# Altium PCB DB46.PcbDoc (part 6 of 6)
Units mm, origin at the board's own origin, x right, y up, seen from the top; angles counter-clockwise.
Board outline 82.2 x 113.2 mm, 8 copper layers (Top Layer, MidLayer1, MidLayer2, GND, MidLayer3, VCC, MidLayer4, Bottom Layer), stack 1.576 mm thick; 186 components, 477 nets, 1727 pads, 1538 vias.
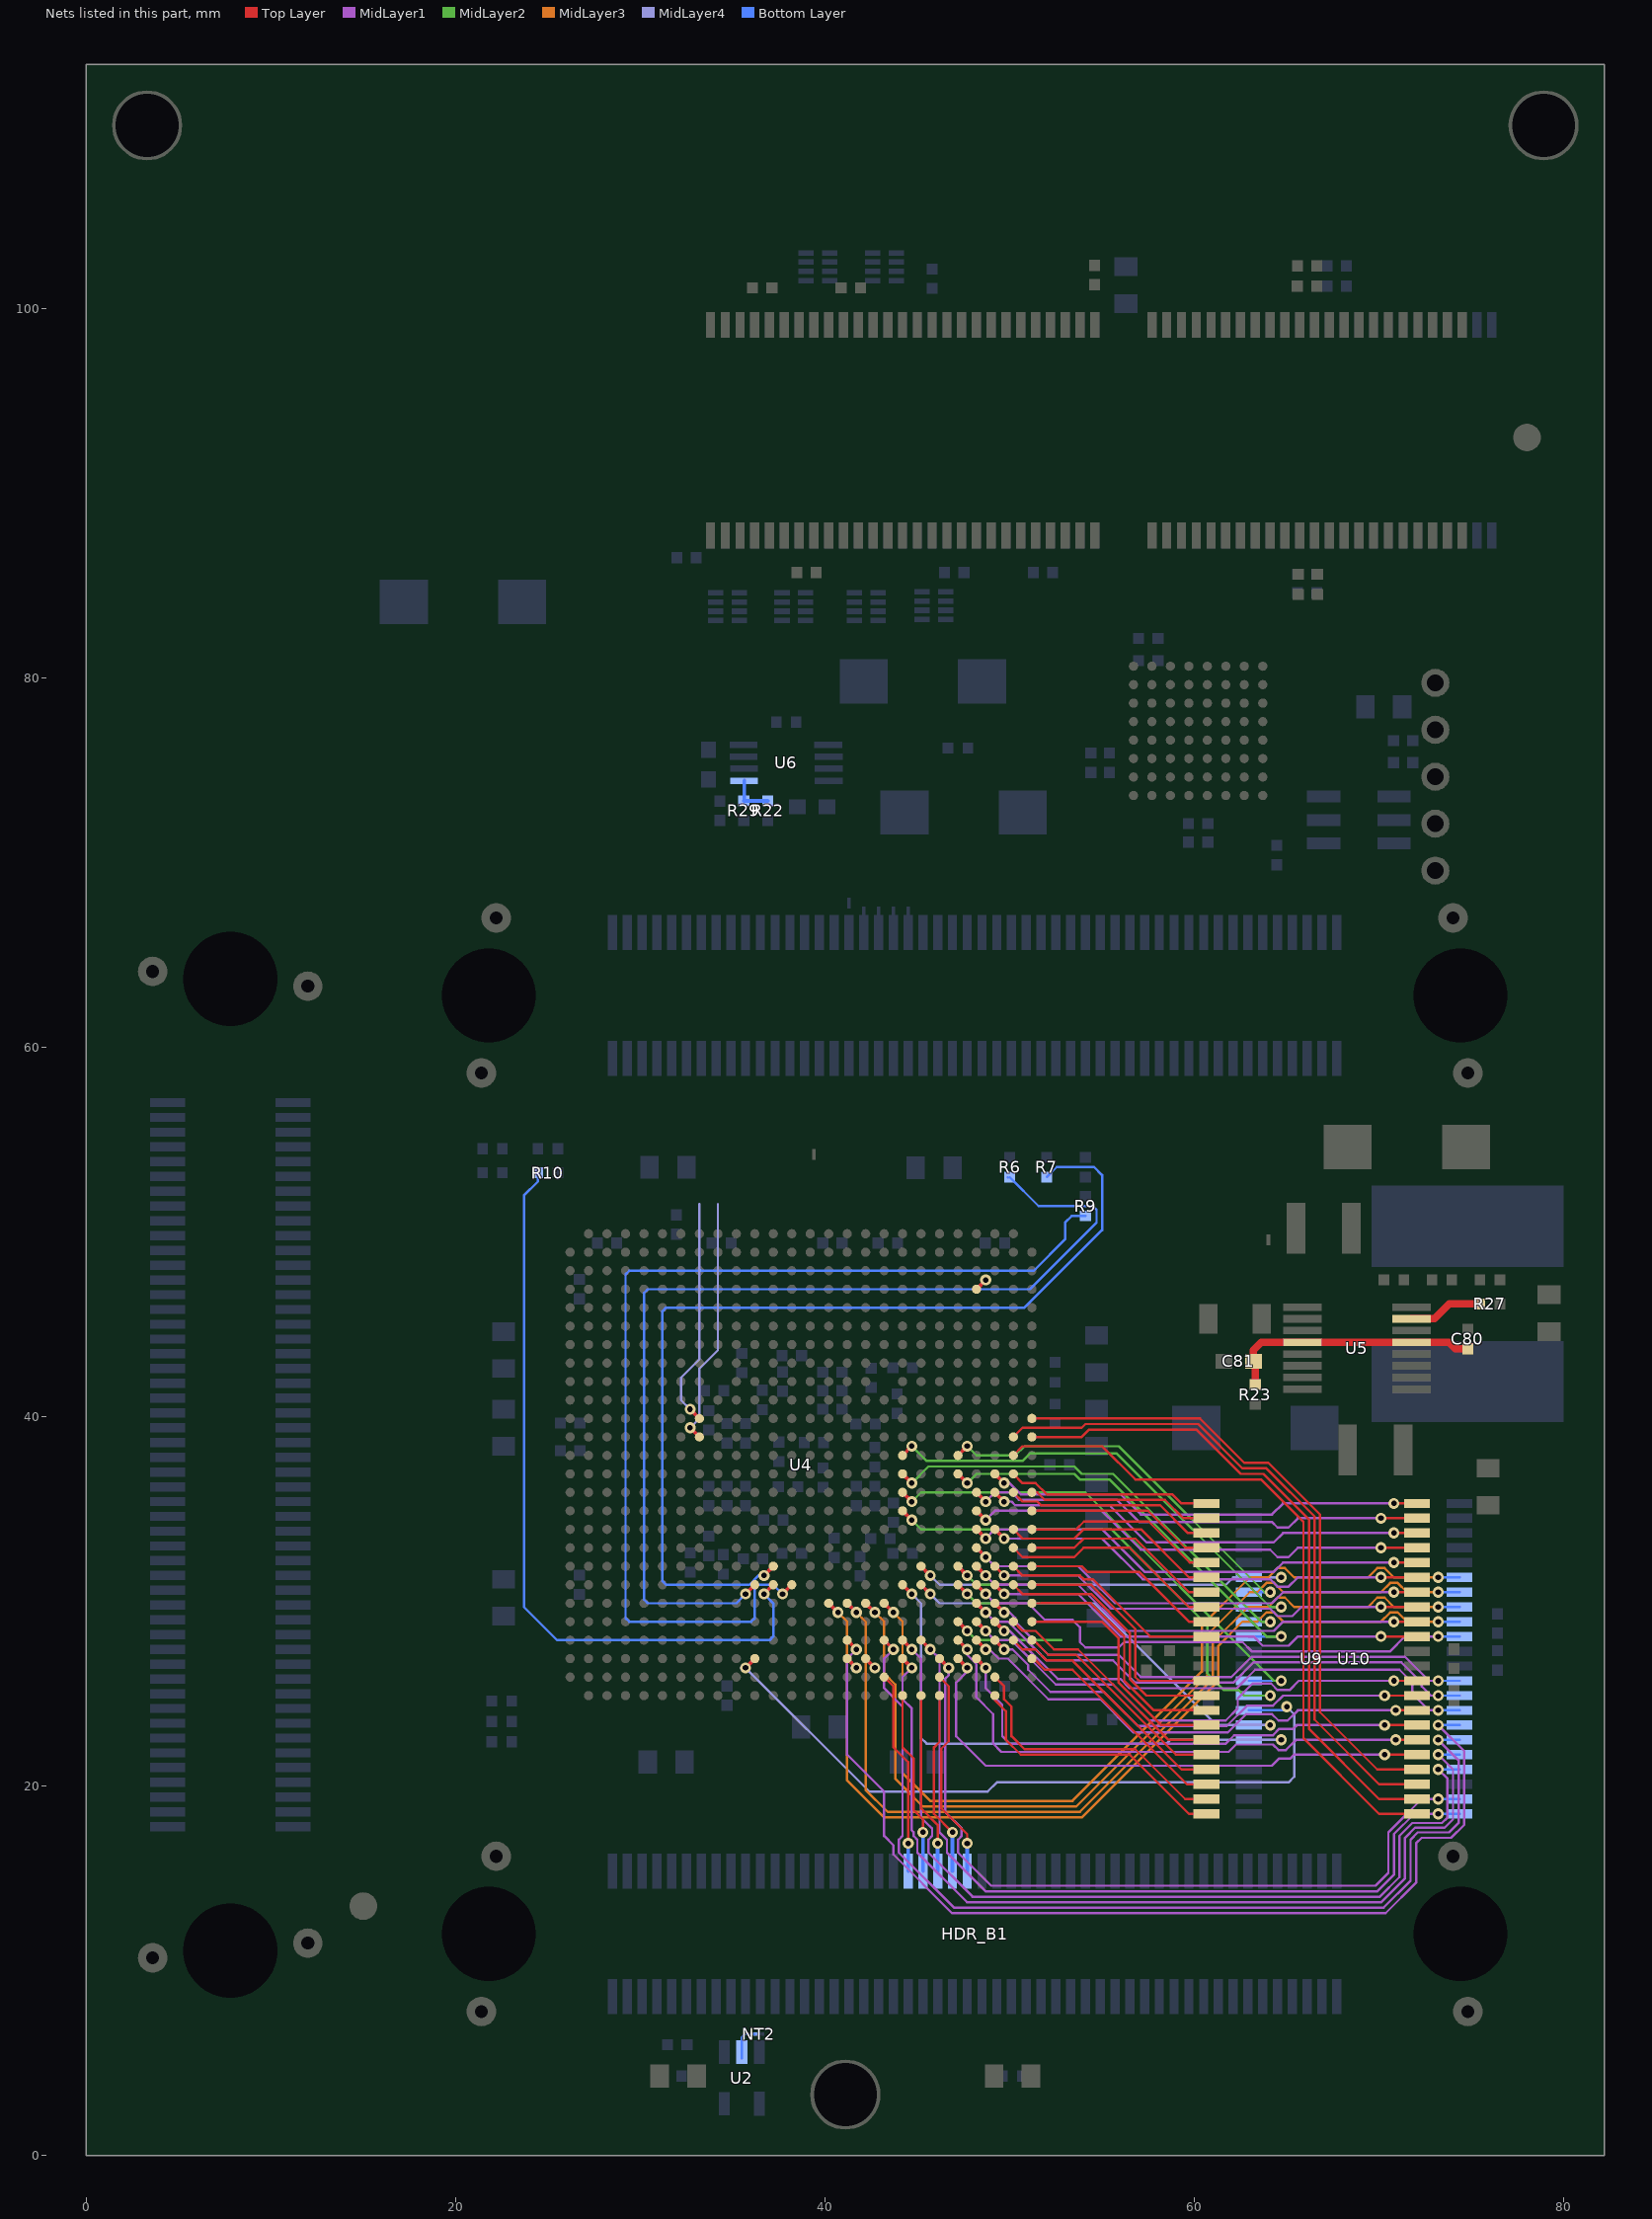
[diagram p12: the nets of this part, all layers, seen from the top]

## Via types
v1: diameter 0.6, hole 0.3, Top Layer to Bottom Layer, 904 vias
v2: diameter 0.6, hole 0.3, Top Layer to Bottom Layer, tented both sides, 506 vias
v3: diameter 0.7, hole 0.4, Top Layer to Bottom Layer, 127 vias
v4: diameter 0.6, hole 0.3, Top Layer to Bottom Layer, tented top, 1 vias

## Nets (pads, with @x,y where several pads share a name; then routed paths per layer and width w, separated by ;. In a path a pad name is that pad's centre, name@x,y a point inside that pad or via, vN(x,y) a via of type N, cw(c..) or ccw(c..) an arc to the next point about the centre after c; other vN are vias at no path point) (continued)
SRAM1_A16: U4.AD21 U10.43 | length 42.4
  Top Layer w0.2: U4.AD21@46.2,26.9 v1(46.7,26.4)
  MidLayer1 w0.127: v1(46.7,26.4) 46.7,26 46.5,25.8 46.5,23.3 46.5,23 46.5,18.6 47.4,17.7 47.4,17.3 47.2,17.1 47.2,16.4 48.994,14.606 69.806,14.606 70.5,15.3 70.5,17.5 72.3,19.3 v1(73.2,19.3)
  Bottom Layer w0.127: v1(73.2,19.3) U10.43@74.352,19.3
SRAM1_A17: U4.AC20 U10.44 | length 43.7
  Top Layer w0.2: U4.AC20@45.2,27.9 v1(45.7,27.4)
  MidLayer1 w0.127: v1(45.7,27.4) 46.2,26.9 46.2,23.3 46.2,23 46.2,17.5 46.6,17.1 46.6,16.4 48.694,14.306 69.906,14.306 70.8,15.2 70.8,17.4 71.9,18.5 v1(73.2,18.5)
  Bottom Layer w0.127: v1(73.2,18.5) U10.44@74.352,18.5
SRAM1_A18: U4.AA18 U10.28 | length 47.7
  Top Layer w0.2: U4.AA18@43.2,29.9 v1(43.7,29.4)
  MidLayer3 w0.127: v1(43.7,29.4) 44.2,28.9 44.2,23.3 44.2,23 44.2,20.7 45.7,19.2 53.4,19.2 60.4,26.2 60.4,28.7 63,31.3 64,31.3 64.5,31.8 64.9,31.8 65.4,31.3 69.4,31.3 69.9,31.8 70.3,31.8 70.8,31.3 v1(73.2,31.3)
  Bottom Layer w0.127: v1(73.2,31.3) U10.28@74.352,31.3
SRAM1_D0: U4.Y20 U10.7 | length 23.3
  Top Layer w0.2: U4.Y20@45.2,30.9 v1(45.7,30.4)
  MidLayer2 w0.127: v1@64.099,23.299 v1(64.105,23.299)
  MidLayer4 w0.127: v1(45.7,30.4) 46.2,29.9 52.8,29.9 53.1,29.9 54.6,29.9 61.2,23.299 v1(64.105,23.299)
  Bottom Layer w0.127: U10.7@62.952,23.3 v1(64.105,23.299) v1@64.205,23.299
SRAM1_D1: U4.AD11 U10.8 | length 39.7
  Top Layer w0.2: v1(35.7,26.4) U4.AD11@36.2,26.9
  MidLayer4 w0.127: v1(35.7,26.4) 42.4,19.7 48.8,19.7 49.3,20.2 65.1,20.2 65.4,20.5 65.4,23.9 v1(65,24.3)
  Bottom Layer w0.127: U10.8@62.952,24.1 64.8,24.1 v1(65,24.3)
  Bottom Layer w0.381: v1@35.592,26.4 v1(35.7,26.4)
SRAM1_D2: U4.T19 U10.9 | length 26.8
  Top Layer w0.2: U4.T19@44.2,34.9 v1(44.7,34.4)
  MidLayer2 w0.127: v1(44.7,34.4) 45.2,33.9 52.8,33.9 53.1,33.9 55.5,33.9 60.7,28.7 60.7,26.1 61.6,25.2 62.4,25.2 62.7,24.9 v1(64.105,24.9)
  Bottom Layer w0.127: U10.9@62.952,24.9 v1@64.205,24.9
SRAM1_D3: U4.R19 U10.10 | length 27
  Top Layer w0.2: U4.R19@44.2,35.9 v1(44.7,35.4)
  MidLayer2 w0.127: v1(44.7,35.4) 45.2,35.9 52.8,35.9 53.1,35.9 54.1,35.9 64.3,25.7 v1(64.7,25.7)
  Bottom Layer w0.127: U10.10@62.952,25.7 v1@64.8,25.7
SRAM1_D4: U4.P22 U10.13 | length 23.4
  Top Layer w0.2: U4.P22@47.2,36.9 v1(47.7,36.4)
  MidLayer2 w0.127: v1(47.7,36.4) 48.2,36.9 52.8,36.9 53.1,36.9 53.5,36.9 53.8,36.6 55.4,36.6 63.9,28.1 v1(64.7,28.1)
  Bottom Layer w0.127: U10.13@62.952,28.1 v1@64.8,28.1
SRAM1_D5: U4.P19 U10.14 | length 25.2
  Top Layer w0.2: U4.P19@44.2,36.9 v1(44.7,36.4)
  MidLayer2 w0.127: v1(44.7,36.4) 45.6,37.3 52.8,37.3 53.1,37.3 53.5,37.3 53.9,36.9 55.6,36.9 63.6,28.9 v1(64.105,28.9)
  Bottom Layer w0.127: U10.14@62.952,28.9 v1@64.205,28.9
SRAM1_D6: U4.N19 U10.15 | length 26.5
  Top Layer w0.178: U4.N19@44.2,37.9 v1(44.7,38.4)
  MidLayer2 w0.127: v1(44.7,38.4) 45.5,37.6 50.7,37.6 51.1,38 52.8,38 53.1,38 55.8,38 64.1,29.7 v1(64.7,29.7)
  Bottom Layer w0.127: U10.15@62.952,29.7 v1@64.8,29.7
SRAM1_D7: U4.N22 U10.16 | length 22.1
  Top Layer w0.2: U4.N22@47.2,37.9 v1(47.7,38.4)
  MidLayer2 w0.127: v1(47.7,38.4) 48.2,37.9 50.3,37.9 50.8,38.4 52.8,38.4 53.1,38.4 55.9,38.4 63.8,30.5 v1(64.105,30.5)
  Bottom Layer w0.127: U10.16@62.952,30.5 v1@64.205,30.5
SRAM1_D8: U4.AA17 U10.29 | length 48.3
  Top Layer w0.2: U4.AA17@42.2,29.9 v1(42.7,29.4)
  MidLayer3 w0.127: v1(42.7,29.4) 43.2,28.9 43.2,26.1 43.8,25.5 43.8,23.3 43.8,23 43.8,20.4 45.3,18.9 53.6,18.9 60.7,26 60.7,28.2 63,30.5 63.405,30.5 63.905,31 64.305,31 64.805,30.5 70.1,30.5 70.6,31 71,31 71.5,30.5 v1(73.2,30.5)
  Bottom Layer w0.127: v1(73.2,30.5) U10.29@74.352,30.5
SRAM1_D9: U4.AA16 U10.30 | length 49.8
  Top Layer w0.2: U4.AA16@41.2,29.9 v1(41.7,29.4)
  MidLayer3 w0.127: v1(41.7,29.4) 42.2,28.9 42.2,23.3 42.2,23 42.2,19.8 43.4,18.6 53.8,18.6 61,25.8 61,27.8 62.9,29.7 64,29.7 64.5,30.2 64.9,30.2 65.4,29.7 69.4,29.7 69.9,30.2 70.3,30.2 70.8,29.7 v1(73.2,29.7)
  Bottom Layer w0.127: v1(73.2,29.7) U10.30@74.352,29.7
SRAM1_D10: U4.AA15 U10.31 | length 50.3
  Top Layer w0.2: U4.AA15@40.2,29.9 v1(40.7,29.4)
  MidLayer3 w0.127: v1(40.7,29.4) 41.2,28.9 41.2,23.3 41.2,23 41.2,20.3 43.2,18.3 53.9,18.3 61.3,25.7 61.3,27.6 62.6,28.9 63.405,28.9 63.905,29.4 64.305,29.4 64.805,28.9 70.1,28.9 70.6,29.4 71,29.4 71.5,28.9 v1(73.2,28.9)
  Bottom Layer w0.127: v1(73.2,28.9) U10.31@74.352,28.9
SRAM1_D11: U4.Y23 U10.32 | length 28.7
  Top Layer w0.2: U4.Y23@48.2,30.9 v1(48.7,30.4)
  MidLayer1 w0.127: v1(48.7,30.4) 49.2,29.9 51,29.9 51.9,29 52.8,29 53.1,29 53.4,29 53.8,28.6 53.8,27.8 54.1,27.5 55.9,27.5 56.2,27.8 62.6,27.8 63.1,27.3 70.6,27.3 71.4,28.1 v1(73.2,28.1)
  Bottom Layer w0.127: v1(73.2,28.1) U10.32@74.352,28.1
SRAM1_D12: U4.AA24 U10.35 | length 27.9
  Top Layer w0.2: U4.AA24@49.2,29.9 v1(49.7,29.4)
  MidLayer1 w0.127: v1(49.7,29.4) 50,29.4 50.3,29.1 50.3,28.9 52.1,27.1 52.8,27.1 53.1,27.1 55.9,27.1 57.1,25.9 62,25.9 63.1,27 71.4,27 72.7,25.7 v1(73.2,25.7)
  Bottom Layer w0.127: v1(73.2,25.7) U10.35@74.352,25.7
SRAM1_D13: U4.AA23 U10.36 | length 29.3
  Top Layer w0.2: U4.AA23@48.2,29.9 v1(48.7,29.4)
  MidLayer1 w0.127: v1(48.7,29.4) 49.2,28.9 49.9,28.9 52,26.8 52.8,26.8 53.1,26.8 55.6,26.8 56.8,25.6 62.1,25.6 63.2,26.7 71.2,26.7 72.3,25.6 72.3,25.4 72.8,24.9 v1(73.2,24.9)
  Bottom Layer w0.127: v1(73.2,24.9) U10.36@74.352,24.9
SRAM1_D14: U4.AB24 U10.37 | length 28.3
  Top Layer w0.2: U4.AB24@49.2,28.9 v1(49.7,28.4)
  MidLayer1 w0.127: v1(49.7,28.4) 50,28.4 52.6,25.8 52.8,25.8 53.1,25.8 56,25.8 56.5,25.3 62.3,25.3 63.3,26.3 71.1,26.3 71.8,25.6 71.8,25 72.7,24.1 v1(73.2,24.1)
  Bottom Layer w0.127: v1(73.2,24.1) U10.37@74.352,24.1
SRAM1_D15: U4.AC16 U10.38 | length 55.6
  Top Layer w0.2: U4.AC16@41.2,27.9 v1(41.7,27.4)
  MidLayer1 w0.127: v1(41.7,27.4) 41.2,26.9 41.2,23.3 41.2,23 41.2,21.7 43.2,19.7 43.2,17.3 43.7,16.8 43.7,16.3 46.875,13.125 70.35,13.125 72,14.775 72,15.3 72,16.9 72.3,17.2 73.9,17.2 74.6,17.9 74.6,21.9 v1(73.2,23.3)
  Bottom Layer w0.127: v1(73.2,23.3) U10.38@74.352,23.3
SRAM1_NBHE: U4.AD19 U10.40 | length 49.5
  Top Layer w0.2: U4.AD19@44.2,26.9 v1(44.7,26.4)
  MidLayer1 w0.127: v1(44.7,26.4) 44.2,25.9 44.2,24.7 44.7,24.2 44.7,23.3 44.7,23 44.7,17.6 44.8,17.5 44.8,17.3 45,17.1 45,16.4 47.681,13.719 70.119,13.719 71.4,15 71.4,15.6 ; 71.4,15.6 71.4,17.2 71.946,17.746 73.546,17.746 74,18.2 74,20.9 v1(73.2,21.7)
  Bottom Layer w0.127: v1(73.2,21.7) U10.40@74.352,21.7
SRAM1_NBLE: U4.AC18 U10.39 | length 53.2
  Top Layer w0.2: U4.AC18@43.2,27.9 v1(43.7,27.4)
  MidLayer1 w0.127: v1(43.7,27.4) 43.2,26.9 43.2,25.3 44.2,24.3 44.2,23.3 44.2,23 44.2,17.3 44,17.1 44,16.4 46.975,13.425 70.25,13.425 71.7,14.875 71.7,15.4 71.7,17.1 72.092,17.492 73.792,17.492 74.3,18 74.3,21.4 v1(73.2,22.5)
  Bottom Layer w0.127: v1(73.2,22.5) U10.39@74.352,22.5
SRAM1_NCS: U4.Y19 U10.6 | length 30.3
  Top Layer w0.2: U4.Y19@44.2,30.9 v1(44.7,30.4)
  MidLayer4 w0.127: v1(44.7,30.4) 45.2,29.9 45.2,23.3 45.2,23 45.2,22.6 45.5,22.3 58.5,22.3 58.7,22.5 v1(64.7,22.5)
  Bottom Layer w0.127: U10.6@62.952,22.5 v1(64.7,22.5) v1@64.8,22.5
SRAM1_NOE: U4.AC19 U10.41 | length 51.3
  Top Layer w0.2: U4.AC19@44.2,27.9 v1(44.7,27.4)
  MidLayer1 w0.127: v1(44.7,27.4) 45.2,26.9 ; 45.2,24 45.2,26.9 ; v1(73.2,20.9) 73.7,20.4 73.7,18.3 73.4,18 71.8,18 71.1,17.3 71.1,15.7 71.1,15.075 70.037,14.012 47.987,14.012 45.6,16.4 45.6,17.1 45.8,17.3 45.8,17.7 45.7,17.8 45.2,18.3 45.2,23 45.2,23.3 45.2,26.9
  Bottom Layer w0.127: v1(73.2,20.9) U10.41@74.352,20.9
SRAM1_NWE: U4.W20 U10.17 | length 21.9
  Top Layer w0.2: U4.W20@45.2,31.9 v1(45.7,31.4)
  MidLayer4 w0.127: v1(45.7,31.4) 46.2,30.9 50.9,30.9 52.8,30.9 53.1,30.9 61.7,30.9 62.1,31.3 v1(64.7,31.3)
  Bottom Layer w0.127: U10.17@62.952,31.3 v1(64.7,31.3) v1@64.8,31.3
SRAM2_A0: U4.N25 U9.1 | length 37.2
  Top Layer w0.127: U4.N25@50.2,37.9 50.7,38.4 52.8,38.4 53.1,38.4 55,38.4 56.8,36.6 63.6,36.6 65.9,34.3 65.9,22.6 70,18.5 U9.1@72.052,18.5
SRAM2_A1: U4.M26 U9.2 | length 35.9
  Top Layer w0.127: U4.M26@51.2,38.9 52.8,38.9 53.1,38.9 53.9,38.9 54.3,39.3 60.1,39.3 62.5,36.9 63.737,36.9 66.2,34.437 66.2,23.1 70,19.3 U9.2@72.052,19.3
SRAM2_A2: U4.M25 U9.3 | length 36.7
  Top Layer w0.127: U4.M25@50.2,38.9 50.7,39.4 52.8,39.4 53.1,39.4 53.9,39.4 54.1,39.6 60.2,39.6 62.6,37.2 63.9,37.2 66.5,34.6 66.5,23.6 70,20.1 U9.3@72.052,20.1
SRAM2_A3: U4.L26 U9.4 | length 35
  Top Layer w0.127: U4.L26@51.2,39.9 52.8,39.9 53.1,39.9 60.3,39.9 62.7,37.5 64,37.5 66.8,34.7 66.8,24 69.9,20.9 U9.4@72.052,20.9
SRAM2_A4: U4.AD22 U9.5 | length 30.5
  Top Layer w0.127: v1(70.299,21.7) U9.5@72.052,21.7
  Top Layer w0.2: U4.AD22@47.2,26.9 v1(47.7,26.4)
  MidLayer1 w0.127: v1(47.7,26.4) 47.7,26.2 47.1,25.6 47.1,23.3 47.1,23 47.1,22.7 48.7,21.1 64.2,21.1 64.6,21.5 65.2,21.5 65.4,21.7 v1(70.299,21.7)
SRAM2_A5: U4.U23 U9.18 | length 25.4
  Top Layer w0.127: v1@70.8,32.1 U9.18@72.052,32.1
  Top Layer w0.2: U4.U23@48.2,33.9 v1(48.7,33.4)
  MidLayer1 w0.127: v1(48.7,33.4) 49.2,33.9 52.1,33.9 52.8,33.9 53.1,33.9 55,33.9 57.3,31.6 64.3,31.6 64.8,32.1 v1(70.8,32.1)
SRAM2_A6: U4.T23 U9.19 | length 25.5
  Top Layer w0.127: v1(70.1,32.9) U9.19@72.052,32.9
  Top Layer w0.2: U4.T23@48.2,34.9 v1(48.7,34.4)
  MidLayer1 w0.127: v1(48.7,34.4) 49.2,34.9 52.8,34.9 53.1,34.9 55,34.9 57.1,32.8 64.1,32.8 64.5,32.4 65.1,32.4 65.6,32.9 v1(70.1,32.9)
SRAM2_A7: U4.R24 U9.20 | length 24.2
  Top Layer w0.127: v1(70.8,33.7) U9.20@72.052,33.7
  Top Layer w0.2: U4.R24@49.2,35.9 v1(49.7,35.4)
  MidLayer1 w0.127: v1(49.7,35.4) 50.1,35.4 50.3,35.2 52.8,35.2 53.1,35.2 55.4,35.2 57.4,33.2 64.3,33.2 64.8,33.7 v1(70.8,33.7)
SRAM2_A8: U4.R23 U9.21 | length 25.3
  Top Layer w0.127: v1(70.1,34.5) U9.21@72.052,34.5
  Top Layer w0.2: U4.R23@48.2,35.9 v1(48.7,35.4)
  MidLayer1 w0.127: v1(48.7,35.4) 49.2,35.9 50.1,35.9 50.5,35.5 52.8,35.5 53.1,35.5 55.8,35.5 57,34.3 64.2,34.3 64.5,34 65.1,34 65.6,34.5 v1(70.1,34.5)
SRAM2_A9: U4.P24 U9.22 | length 24
  Top Layer w0.127: v1(70.8,35.3) U9.22@72.052,35.3
  Top Layer w0.2: U4.P24@49.2,36.9 v1(49.7,36.4)
  MidLayer1 w0.127: v1(49.7,36.4) 50,36.4 50.6,35.8 52.8,35.8 53.1,35.8 56,35.8 57.1,34.7 64.2,34.7 64.8,35.3 v1(70.8,35.3)
SRAM2_A10: U4.P25 U9.23 | length 11.1
  Top Layer w0.127: U4.P25@50.2,36.9 50.7,36.4 51.4,36.4 52,35.8 52.8,35.8 53.1,35.8 58.8,35.8 59.3,35.3 U9.23@60.6,35.3
SRAM2_A11: U4.R26 U9.24 | length 10
  Top Layer w0.127: U4.R26@51.2,35.9 51.5,35.9 51.9,35.5 52.8,35.5 53.1,35.5 58.4,35.5 59.4,34.5 U9.24@60.652,34.5
SRAM2_A12: U4.R25 U9.25 | length 11.4
  Top Layer w0.127: U4.R25@50.2,35.9 50.7,35.4 51.5,35.4 51.7,35.2 52.8,35.2 53.1,35.2 58.15,35.2 59.65,33.7 U9.25@60.652,33.7
SRAM2_A13: U4.T26 U9.26 | length 10.3
  Top Layer w0.127: U4.T26@51.2,34.9 52.8,34.9 53.1,34.9 57.5,34.9 59.5,32.9 U9.26@60.652,32.9
SRAM2_A14: U4.U26 U9.27 | length 10.6
  Top Layer w0.127: U4.U26@51.2,33.9 52.8,33.9 53.1,33.9 53.6,33.9 54.025,34.325 57.525,34.325 59.75,32.1 U9.27@60.652,32.1
SRAM2_A15: U4.AD26 U9.42 | length 12.3
  Top Layer w0.127: U4.AD26@51.2,26.9 51.3,26.9 51.9,26.3 52.8,26.3 53.1,26.3 53.4,26.3 59.6,20.1 U9.42@60.652,20.1
SRAM2_A16: U4.AE24 U9.43 | length 15.6
  Top Layer w0.127: U4.AE24@49.2,25.9 49.7,25.4 49.7,24.7 50.1,24.3 50.1,23.3 50.1,23 50.1,22.7 50.8,22 56.8,22 59.5,19.3 U9.43@60.7,19.3
SRAM2_A17: U4.AF24 U9.44 | length 15.2
  Top Layer w0.127: U4.AF24@49.2,24.9 49.2,24.65 49.8,24.05 49.8,23.3 49.8,23 49.8,22.5 50.6,21.7 56.5,21.7 59.7,18.5 U9.44@60.7,18.5
SRAM2_A18: U4.U25 U9.28 | length 11.9
  Top Layer w0.127: U4.U25@50.2,33.9 50.7,33.4 52.8,33.4 53.1,33.4 53.5,33.4 54,33.9 57.1,33.9 59.7,31.3 U9.28@60.652,31.3
SRAM2_D0: U4.AD23 U9.7 | length 27.8
  Top Layer w0.127: v1(70.299,23.3) U9.7@72.052,23.3
  Top Layer w0.2: U4.AD23@48.2,26.9 v1(48.7,26.4)
  MidLayer1 w0.127: v1(48.7,26.4) 48.7,25.3 49.6,24.4 49.6,23.3 49.6,23 49.6,22.7 50,22.3 61.7,22.3 62.15,22.75 64.25,22.75 64.6,23.1 65.35,23.1 65.55,23.3 v1(70.299,23.3)
SRAM2_D1: U4.AC23 U9.8 | length 26.7
  Top Layer w0.127: v1(70.9,24.1) U9.8@72.052,24.1
  Top Layer w0.2: U4.AC23@48.2,27.9 v1(48.7,27.4)
  MidLayer1 w0.127: v1(48.7,27.4) 48.9,27.4 49.4,26.9 49.9,26.9 52.1,24.7 52.8,24.7 53.1,24.7 54.9,24.7 56.7,22.9 61.8,22.9 62.8,23.9 64.2,23.9 64.55,23.55 65.05,23.55 65.6,24.1 v1(70.9,24.1)
SRAM2_D2: U4.AC24 U9.9 | length 25.6
  Top Layer w0.127: v1(70.299,24.9) U9.9@72.052,24.9
  Top Layer w0.2: U4.AC24@49.2,27.9 v1(49.7,27.4)
  MidLayer1 w0.127: v1(49.7,27.4) 50.15,27.4 51,26.55 51,26.3 52.2,25.1 52.8,25.1 53.1,25.1 55.1,25.1 56.95,23.25 61.75,23.25 62.85,24.35 64.25,24.35 64.8,24.9 v1(70.299,24.9)
SRAM2_D3: U4.AB23 U9.10 | length 27.6
  Top Layer w0.127: v1(70.8,25.7) U9.10@72.052,25.7
  Top Layer w0.2: U4.AB23@48.2,28.9 v1(48.7,28.4)
  MidLayer1 w0.127: v1(48.7,28.4) 49.2,27.9 50.1,27.9 52.5,25.5 52.8,25.5 53.1,25.5 55.6,25.5 57.55,23.55 61.691,23.55 62.35,24.209 62.35,24.75 63.15,25.55 64.15,25.55 64.5,25.2 65.15,25.2 65.65,25.7 v1(70.8,25.7)
SRAM2_D4: U4.Y24 U9.13 | length 24.4
  Top Layer w0.127: v1(70.1,28.1) U9.13@72.052,28.1
  Top Layer w0.2: U4.Y24@49.2,30.9 v1(49.7,30.4)
  MidLayer1 w0.127: v1(49.7,30.4) 52.8,30.4 53.1,30.4 53.7,30.4 56,28.1 63.2,28.1 63.7,27.6 65.1,27.6 65.6,28.1 v1(70.1,28.1)
SRAM2_D5: U4.W23 U9.14 | length 25.5
  Top Layer w0.127: v1(70.8,28.9) U9.14@72.052,28.9
  Top Layer w0.2: U4.W23@48.2,31.9 v1(48.7,31.4)
  MidLayer1 w0.127: v1(48.7,31.4) 49.2,30.9 52.8,30.9 53.1,30.9 53.7,30.9 56.2,28.4 64.3,28.4 64.8,28.9 v1(70.8,28.9)
SRAM2_D6: U4.W24 U9.15 | length 24.2
  Top Layer w0.127: U4.W24@49.2,31.9 v1(49.7,31.4) ; v1(70.1,29.7) U9.15@72.052,29.7
  MidLayer1 w0.127: v1(49.7,31.4) 52.8,31.4 53.1,31.4 53.7,31.4 55.5,29.6 64.1,29.6 64.5,29.2 65.3,29.2 65.8,29.7 v1(70.1,29.7)
SRAM2_D7: U4.V23 U9.16 | length 25.3
  Top Layer w0.127: v1(70.8,30.5) U9.16@72.052,30.5
  Top Layer w0.2: U4.V23@48.2,32.9 v1(48.7,32.4)
  MidLayer1 w0.127: v1(48.7,32.4) 49.2,31.9 52.8,31.9 53.1,31.9 53.7,31.9 55.7,29.9 64.2,29.9 64.8,30.5 v1(70.8,30.5)
SRAM2_D8: U4.V26 U9.29 | length 10.9
  Top Layer w0.127: U4.V26@51.2,32.9 52.8,32.9 53.1,32.9 53.5,32.9 54,33.4 56.8,33.4 59.7,30.5 U9.29@60.652,30.5
SRAM2_D9: U4.V25 U9.30 | length 12.2
  Top Layer w0.127: U4.V25@50.2,32.9 50.7,32.4 52.8,32.4 53.1,32.4 53.5,32.4 54,32.9 56.5,32.9 59.7,29.7 U9.30@60.652,29.7
SRAM2_D10: U4.W26 U9.31 | length 10.7
  Top Layer w0.127: U4.W26@51.2,31.9 52.8,31.9 53.1,31.9 53.9,31.9 54.2,31.6 57,31.6 59.7,28.9 U9.31@60.652,28.9
SRAM2_D11: U4.W25 U9.32 | length 12
  Top Layer w0.127: U4.W25@50.2,31.9 50.7,31.4 52.8,31.4 53.1,31.4 53.8,31.4 54,31.2 54.5,31.2 57.6,28.1 U9.32@60.652,28.1
SRAM2_D12: U4.Y26 U9.35 | length 13.1
  Top Layer w0.127: U4.Y26@51.2,30.9 52.8,30.9 53.1,30.9 54.4,30.9 56.8,28.5 56.8,25.9 57,25.7 U9.35@60.652,25.7
SRAM2_D13: U4.Y25 U9.36 | length 14.4
  Top Layer w0.127: U4.Y25@50.2,30.9 50.7,30.4 52.3,30.4 ; 52.3,30.4 53.6,30.4 54.4,30.4 56.5,28.3 56.5,25.8 57.4,24.9 U9.36@60.652,24.9
SRAM2_D14: U4.AA26 U9.37 | length 13.3
  Top Layer w0.127: U4.AA26@51.2,29.9 51.7,29.9 53.2,29.9 53.5,29.9 54.399,29.9 56.2,28.099 56.2,25.7 57.8,24.1 U9.37@60.652,24.1
SRAM2_D15: U4.AB26 U9.38 | length 13.2
  Top Layer w0.127: U4.AB26@51.2,28.9 52.5,28.9 52.8,28.9 55,28.9 55.9,28 55.9,25.6 58.2,23.3 U9.38@60.652,23.3
SRAM2_NBHE: U4.AC26 U9.40 | length 12
  Top Layer w0.127: U4.AC26@51.2,27.9 51.3,27.9 52.1,27.1 52.8,27.1 53.1,27.1 53.6,27.1 55.3,25.4 59,21.7 U9.40@60.652,21.7
SRAM2_NBLE: U4.AB25 U9.39 | length 13.1
  Top Layer w0.127: U4.AB25@50.2,28.9 50.7,28.4 51.4,28.4 52.4,27.4 52.8,27.4 53.1,27.4 53.7,27.4 55.6,25.5 58.6,22.5 U9.39@60.652,22.5
SRAM2_NCS: U4.AC22 U9.6 | length 30
  Top Layer w0.127: v1(70.9,22.5) U9.6@72.052,22.5
  Top Layer w0.2: U4.AC22@47.2,27.9 v1(47.7,27.4)
  MidLayer1 w0.127: v1(47.7,27.4) 47.7,27.1 48.2,26.6 48.2,24.8 49.1,23.9 49.1,23.3 49.1,23 49.1,22.3 49.55,21.85 61.85,21.85 62.25,22.25 64.25,22.25 64.55,21.95 64.95,21.95 65.5,22.5 v1(70.9,22.5)
SRAM2_NOE: U4.AC25 U9.41 | length 13.4
  Top Layer w0.127: U4.AC25@50.2,27.9 50.7,27.4 51.4,27.4 52,26.8 52.8,26.8 53.1,26.8 53.4,26.8 59.3,20.9 U9.41@60.652,20.9
SRAM2_NWE: U4.U24 U9.17 | length 24.3
  Top Layer w0.127: v1(70.1,31.3) U9.17@72.052,31.3
  Top Layer w0.2: U4.U24@49.2,33.9 v1(49.7,33.4)
  MidLayer1 w0.127: v1(49.7,33.4) 52.8,33.4 53.1,33.4 55,33.4 57.2,31.2 64.1,31.2 64.5,30.8 65.1,30.8 65.6,31.3 v1(70.1,31.3)
STATUS_LED: NT2.1 U2.2 | length 1.9
  Bottom Layer w0.127: U2.2@35.5,5.275 U2.2@35.5,5.6 35.5,6.4 35.675,6.575 NT2.1@36.2,6.575
SW0: HDR_B1.42 U4.AE18 | length 11
  Top Layer w0.127: U4.AE18@43.2,25.9 43.7,25.4 43.7,23.3 43.7,23 43.7,22.1 44.5,21.3 v2(44.5,16.9)
  Bottom Layer w0.2: HDR_B1.42@44.5,15.4 v2(44.5,16.9)
SW1: HDR_B1.44 U4.AF19 | length 10
  Top Layer w0.127: U4.AF19@44.2,24.9 44.2,23.3 44.2,23 44.2,22.1 44.8,21.5 44.8,18.7 45.3,18.2 v2(45.3,17.5)
  Bottom Layer w0.2: HDR_B1.44@45.3,15.4 v2(45.3,17.5)
SW2: HDR_B1.46 U4.AF20 | length 9.9
  Top Layer w0.127: U4.AF20@45.2,24.9 45.2,23.3 45.2,23 45.2,18.8 46.1,17.9 v2(46.1,16.9)
  Bottom Layer w0.2: HDR_B1.46@46.1,15.4 v2(46.1,16.9)
SW3: HDR_B1.48 U4.AF21 | length 10
  Top Layer w0.127: U4.AF21@46.2,24.9 46.2,23.3 46.2,23 46.2,22.4 45.9,22.1 45.9,18.5 v2@46.9,17.5
  Bottom Layer w0.2: HDR_B1.48@46.9,15.4 v2(46.9,17.5)
SW4: HDR_B1.50 U4.AE21 | length 11.5
  Top Layer w0.127: U4.AE21@46.2,25.9 46.7,25.4 46.7,23.3 46.7,23 46.7,22.425 46.3,22.025 46.3,18.8 47.7,17.4 v2(47.7,16.9)
  Bottom Layer w0.2: HDR_B1.50@47.7,15.4 v2(47.7,16.9)
TCK: R7.2 U4.W12 | length 53.1
  Top Layer w0.2: v1(36.7,31.4) U4.W12@37.2,31.9
  Bottom Layer w0.127: v1(36.7,31.4) 36.4,31.4 35.9,30.9 31.4,30.9 31.2,31.1 31.2,45.7 31.4,45.9 50.8,45.9 55,50.1 55,53.076 54.56,53.515 52.553,53.515 R7.2@52,52.962
TDI: R10.2 U4.Y12 | length 41.4
  Top Layer w0.2: v1(36.7,30.4) U4.Y12@37.2,30.9
  Bottom Layer w0.127: R10.2@24.462,53.2 24.462,52.738 23.7,51.976 23.7,29.7 25.5,27.9 37,27.9 37.2,28.1 37.2,29.9 v1(36.7,30.4)
TDO: R9.2 U4.Y13 | length 56.7
  Top Layer w0.2: v1(37.7,30.4) U4.Y13@38.2,30.9
  Bottom Layer w0.127: v1(37.7,30.4) 37.2,30.9 36.3,30.9 36.2,30.8 36.2,29.1 36,28.9 29.4,28.9 29.2,29.1 29.2,33.7 29.2,47.7 29.4,47.9 30.4,47.9 51.3,47.9 53,49.6 53,50.5 53.362,50.862 R9.2@54.1,50.862
TMS: R6.2 U4.Y11 | length 55.3
  Top Layer w0.2: v1(35.7,30.4) U4.Y11@36.2,30.9
  Bottom Layer w0.127: v1(35.7,30.4) 35.2,29.9 30.4,29.9 30.2,30.1 30.2,46.7 30.4,46.9 51.1,46.9 54.7,50.5 54.7,51.2 54.5,51.4 51.562,51.4 R6.2@50,52.962 ; R6.2@49.9,52.962 R6.2@49.905,52.939
TOFF: R27.1 U5.7 | length 4.1
  Top Layer w0.4: U5.7@71.744,45.294 71.75,45.3 73,45.3 73.8,46.1 R27.1@75.462,46.1
UNUSED1: U4.D23 | length 0.7
  Top Layer w0.2: U4.D23@48.2,46.9 v1(48.7,47.4)
UNUSED2: U4.AB22 | length 6
  Top Layer w0.2: U4.AB22@47.2,28.9 v1(47.7,28.4)
  MidLayer2 w0.127: v1(47.7,28.4) 48.2,27.9 52.8,27.9
UNUSED3: U4.Y22 | length 6
  Top Layer w0.2: U4.Y22@47.2,30.9 v1(47.7,30.4)
  MidLayer2 w0.127: v1(47.7,30.4) 48.2,29.9 52.8,29.9
UNUSED4: U4.M8 | length 13.4
  Top Layer w0.2: v1(32.7,39.4) U4.M8@33.2,38.9
  MidLayer4 w0.127: v1(32.7,39.4) 33.2,39.9 33.2,42.6 34.2,43.6 34.2,51.5
UNUSED5: U4.L8 | length 12.4
  Top Layer w0.2: v1(32.7,40.4) U4.L8@33.2,39.9
  MidLayer4 w0.127: v1(32.7,40.4) 32.2,40.9 32.2,42.1 33.2,43.1 33.2,51.5
UNUSED6: U4.W22 | length 6
  Top Layer w0.2: U4.W22@47.2,31.9 v1(47.7,31.4)
  MidLayer2 w0.127: v1(47.7,31.4) 48.2,30.9 52.8,30.9
VFILT: C80.1 C81.1 R23.2 U5.5 U5.12 | length 13.8
  Top Layer w0.4: R23.2@63.3,41.738 63.3,42.9 C81.1@63.2,43 63.2,43.6 63.624,44.024 U5.12@65.852,44.024 ; U5.12@65.852,44.024 U5.5@71.744,44.024 73.775,44.025 74.125,43.675 C80.1@74.8,43.675
VRN_7: U4.AD17 | length 0.7
  Top Layer w0.2: U4.AD17@42.2,26.9 v1(42.7,26.4)
VRP_7: U4.AD16 | length 0.8
  Top Layer w0.2: U4.AD16@41.2,26.9 v1(41.7,26.4)
  Bottom Layer w0.381: v1@41.592,26.4 v1(41.7,26.4)
VSET: R22.1 R29.1 U6.5 | length 2.4
  Bottom Layer w0.203: R29.1@35.6,73.338 R22.1@36.9,73.338 ; R29.1@35.625,73.363 U6.5@35.625,74.425
pads on no net: FD1.0 FD2.0 HDR_B1.93 HDR_B1.95 HDR_B1.MH5 HDR_B1.MH6 HDR_L1.MH5 HDR_L1.MH6 HDR_T1.95 HDR_T1.MH5 HDR_T1.MH6 MH1.MOUNT MH2.MOUNT MH3.MOUNT U1.5 U2.1 U3.A1 U3.A8 U3.B1 U3.B4 U3.C1 U3.D1 U3.E1 U3.F8 U3.G1 U3.G8 U3.H1 U3.H8 U4.A3 U4.A4 U4.A5 U4.A11 U4.AD7 U4.AD20 U4.AD25 U4.AE7 U4.AE20 U4.B3 U4.B4 U4.C5 U4.D5 U4.E7 U4.E9 U4.G5 U4.G6 U4.G11 U4.G13 U4.G21 U4.G22 U4.H7 U4.H8 U4.H12 U4.H13 U4.N24 U4.R5 U4.R6 U4.R21 U4.R22 U4.T21 U4.W13 U4.Y14 U7.40 U8.40
copper on no net: | length 13.1
  Top Layer w0.127: v1(31.7,25.4) 32.2,25.9 ; 45.2,25.9 v1(45.7,25.4)
  Top Layer w0.2: v1(29.7,35.4) 30.2,35.9 ; v1(29.7,44.4) 30.2,43.9 ; v1(30.7,35.4) 31.2,35.9 ; v1(30.7,44.4) 31.2,43.9 ; v1(31.7,26.4) 32.2,26.9 ; 38.2,43.9 38.2,43.925 ; 39.2,30.85 39.2,30.9 ; 45.2,26.9 v1(45.7,26.4) ; 46.2,34.9 v1(46.7,34.4) ; 46.2,35.9 v1(46.7,35.4) ; 46.2,43.9 v1(46.7,44.4) ; 47.2,35.9 v1(47.7,35.4) ; 47.2,43.9 v1(47.7,44.4) ; 49.2,37.9 v1(49.7,38.4)
  MidLayer1 w0.127: v1(49.7,38.4) 52.8,38.4
  Bottom Layer w0.2: v1@45.7,26.361 v1(45.7,26.4)
  other v1: 41.1,1.1 39.544,1.744 42.656,1.744 38.9,3.3 43.3,3.3 39.544,4.856 42.656,4.856 41.1,5.5 3.3,107.7 78.9,107.7 1.744,108.344 4.856,108.344 77.344,108.344 80.456,108.344 1.1,109.9 5.5,109.9 76.7,109.9 81.1,109.9 1.744,111.456 4.856,111.456 77.344,111.456 80.456,111.456 3.3,112.1 78.9,112.1

## Polygon pours and split planes (outlines as drawn)
AGND on Top Layer "Toplayer- AGND" (solid, remove dead copper, pour order 1000): 60.391,52.77 60.391,42.6 78.443,42.6 78.443,52.77
GND on Top Layer "GROUND-TOP-LAYER" (solid, remove dead copper, pour order 1009): 0.5,104.968 7.587,104.968 7.587,112 74.412,112 74.412,104.968 81.5,104.968 81.5,0.5 46.062,0.5 46.062,7.531 35.937,7.531 35.937,0.5 0.5,0.5
1V2 on MidLayer1 "MidLayer1-1V2" (solid, remove dead copper, pour order 1002): 32.2,45 48.6,45 48.2,44.6 48.2,29.9 32.5,29.9 32.2,29.9 32.2,36 18.4,36 18.4,39.4 32.2,39.4
1V2 on MidLayer1 "1V2 Power" (solid, remove dead copper, pour order 1003): 79.3,56.1 79.3,35.7 43.603,35.7 43.5,35.6 43.5,38.6 54.919,38.6 55.228,38.9 61.4,44.9 61.4,47.8 61.4,55.8 61.091,56.1 79.3,56.1
GND on MidLayer1 "GROUND-MID1-LAYER" (solid, remove dead copper, pour order 1005): 0.5,104.968 7.587,104.968 7.587,112 74.412,112 74.412,104.968 81.5,104.968 81.5,0.5 46.062,0.5 46.062,7.531 35.937,7.531 35.937,0.5 0.5,0.5
GND on MidLayer2 "GROUND-MID2-LAYER" (solid, remove dead copper, pour order 1006): 0.5,104.968 7.587,104.968 7.587,112 74.412,112 74.412,104.968 81.5,104.968 81.5,0.5 46.062,0.5 46.062,7.531 35.937,7.531 35.937,0.5 0.5,0.5
GND on MidLayer3 "GROUND-MID3-LAYER" (solid, remove dead copper, pour order 1007): 0.5,104.968 7.587,104.968 7.587,112 74.412,112 74.412,104.968 81.5,104.968 81.5,0.5 46.062,0.5 46.062,7.531 35.937,7.531 35.937,0.5 0.5,0.5
2V5 on MidLayer4 "2V5 Plane" (solid, remove dead copper, pour order 1001): 48,22.8 48,50.1 38.735,58.166 38.735,71.374 42.418,71.374 42.418,78.105 47.498,78.105 47.498,81.534 34.925,81.534 26.6,73.8 21.7,68.9 21.7,54.1 26.7,54.1 31.4,49.5 31.4,22.8
GND on MidLayer4 "MidLayer4-GND" (solid, remove dead copper, pour order 1004): 0.4,112.7 0.5,112.8 81.6,112.8 81.6,0.5 0.5,0.5
GND on Bottom Layer "GROUND-BOTTOM-LAYER" (solid, remove dead copper, pour order 1008): 0.5,104.968 7.587,104.968 7.587,112 74.412,112 74.412,104.968 81.5,104.968 81.5,0.5 46.062,0.5 46.062,7.531 35.937,7.531 35.937,0.5 0.5,0.5
GND on GND (split plane): 81.689,112.689 81.689,0.51 0.51,0.51 0.51,112.689 38.7,112.689
3V3 on VCC (split plane): 38.7,112.689 68.627,112.689 68.627,103.155 68.635,103.09 68.66,103.029 68.7,102.977 69.113,102.565 69.135,102.547 69.165,102.525 69.226,102.499 69.291,102.491 77.264,102.491 78.894,100.86 78.894,58.905 77.841,57.852 74.204,57.852 71.178,60.878 71.126,60.918 71.065,60.943 71,60.952 66.8,60.952 66.735,60.943 66.674,60.918 66.622,60.878 66.472,60.728 66.432,60.676 66.406,60.615 66.398,60.55 66.398,56.054 61.722,51.378 61.682,51.326 61.656,51.265 61.648,51.2 61.648,40.4 61.656,40.335 61.682,40.274 61.722,40.222 62.122,39.822 62.174,39.782 62.235,39.756 62.3,39.748 65.6,39.748 65.665,39.756 65.726,39.782 65.778,39.822 66.504,40.548 68.889,40.548 69.217,40.22 69.217,36.576 69.225,36.511 69.251,36.45 69.291,36.398 69.418,36.271 69.47,36.231 69.531,36.205 69.596,36.197 76.346,36.197 77.348,35.195 77.348,32.7 77.348,31.6 77.348,20.204 74.895,17.752 72.1,17.752 72.035,17.743 71.974,17.718 71.922,17.678 70.622,16.378 70.582,16.326 70.556,16.265 70.548,16.2 70.548,13.304 66.472,9.228 66.432,9.176 66.406,9.115 66.398,9.05 66.398,0.51 0.51,0.51 0.51,112.689 38.7,112.689
5V0 on VCC (split plane): 81.689,112.689 81.689,0.51 66.902,0.51 66.902,8.945 70.978,13.022 71.018,13.074 71.043,13.135 71.052,13.2 71.052,16.095 72.204,17.248 75,17.248 75.065,17.256 75.126,17.282 75.178,17.322 77.778,19.922 77.801,19.951 77.818,19.974 77.826,19.992 77.843,20.035 77.852,20.1 77.852,31.6 77.852,32.7 77.852,35.3 77.843,35.365 77.818,35.426 77.796,35.456 77.778,35.478 76.629,36.627 76.577,36.667 76.516,36.692 76.451,36.701 69.721,36.701 69.721,40.325 69.712,40.39 69.687,40.451 69.647,40.503 69.172,40.978 69.12,41.018 69.059,41.043 68.994,41.052 66.4,41.052 66.335,41.043 66.274,41.018 66.222,40.978 65.495,40.252 62.404,40.252 62.152,40.504 62.152,51.095 66.828,55.772 66.868,55.824 66.893,55.885 66.902,55.95 66.902,60.445 66.904,60.448 70.895,60.448 73.922,57.422 73.944,57.404 73.974,57.382 74.035,57.356 74.1,57.348 77.945,57.348 78.011,57.356 78.071,57.382 78.124,57.422 79.325,58.623 79.365,58.675 79.39,58.736 79.398,58.801 79.398,100.965 79.39,101.03 79.365,101.091 79.342,101.121 79.325,101.143 77.547,102.921 77.494,102.961 77.434,102.986 77.368,102.995 69.396,102.995 69.131,103.26 69.131,112.689

## Keep-outs
Bottom Layer:
  rectangle: 33.297,106.543 38.297,108.943
  rectangle: 6.5,80 11.5,82.4
  rectangle: 67.15,84.7 72.15,86.8
Keep-Out Layer:
  circle w0.4: c74.392,62.8 r3
  circle w0.4: c21.792,62.8 r3
  circle w0.4: c7.792,63.7 r3
  circle w0.4: c7.792,11.1 r3
  circle w0.4: c21.792,12 r3
  circle w0.4: c74.392,12 r3
  region: 0,113.2 0,112.6 82.2,112.6 82.2,113.2
  rectangle: 0,0 82.2,0.6
  rectangle: 0,0 0.6,113.2
  region: 82.2,113.2 81.6,113.2 81.6,0 82.2,0

## Other copper
Top Layer:
  rectangle net AGND: 63.896,48.646 64.099,49.337
  rectangle net GND: 76.5,34.7 77,35.7
  rectangle net 5V0: 71.3,36.821 75.06,39.573
  rectangle net 5V0: 73.289,37.573 76.631,43.189
  region net LX: 70.325,43.6 67.2,43.6 67.2,41.207 70.325,41.207
  rectangle net 1V2: 72.4,53.34 76.9,55.753
  rectangle net GND: 78.575,45.049 79.822,45.349
  rectangle net GND: 67.2,64.8 69.6,68.4
  rectangle net 5V0: 67.2,57.2 69.6,60.8
  pour cut-out: 25.284,50.992 52.208,50.992 52.208,24.068 25.284,24.068
Bottom Layer:
  rectangle net 1V2: 67.085,48.304 70.8,51.913
  rectangle net 5V0: 67.2,6.4 69.6,8.8
  rectangle net LX: 67,41.1 71.1,43.9
  rectangle net 1V2: 72.4,50.1 76.9,55.7
  region net LX: 62.377,48.776 62.377,51.824 58.567,51.824 58.567,48.776
  rectangle net 3V3: 65.1,14.5 66.3,17.9
  rectangle net GND: 67.2,15.2 69.6,17.7
  rectangle net GND: 67.2,66 69.6,68.5
  rectangle net 5V0: 67.2,57.1 69.6,59.6
  rectangle net 5V0: 66.8,57.1 69.6,59.6
GND (plane layer: these items are gaps in the copper):
  text "GND" at 41.8,11.1 h1.52
VCC (plane layer: these items are gaps in the copper):
  lines w0.5: 66.65,0 66.65,9.05 70.8,13.2 70.8,16.2 72.1,17.5 75,17.5 77.6,20.1 77.6,31.6 77.6,32.7 77.6,35.3 76.451,36.449 69.596,36.449 69.469,36.576 69.469,40.325 68.994,40.8 66.4,40.8 65.6,40 62.3,40 61.9,40.4 61.9,51.2 66.65,55.95 66.65,60.55 66.8,60.7 71,60.7 74.1,57.6 77.945,57.6 79.146,58.801 79.146,100.965 77.368,102.743 69.291,102.743 68.879,103.155 68.879,113.2
  text "5V0" at 70.9,46.4 h1.52
  text "3V3" at 42.1,11.1 h1.52

## Silkscreen, mask and mechanical layers (free items; w line width, h text height)
Top Overlay:
  rectangle: 33.05,89 55.35,91.35
  rectangle: 56.85,88.975 75.359,91.325
  rectangle: 75.7,106.2 82.1,106.7
  rectangle: 72.8,106.2 75.7,113.2
  region: 47,112.975 43.025,112.975 43.025,106.2 47,106.2
  region: 75.4,112.75 75.4,113.2 43.025,113.2 43.025,112.75
  region: 75.8,106.2 75.8,107.025 43.025,107.025 43.025,106.2
  region: 42.925,106.2 42.925,113.2 42.425,113.2 42.425,106.2
  region: 40.6,106.2 40.6,113.2 40.475,113.2 40.475,106.2
  region: 41.1,106.2 41.1,113.2 40.9,113.2 40.9,106.2
  region: 41.675,106.2 41.675,113.2 41.375,113.2 41.375,106.2
  region: 42.275,106.2 42.275,113.2 41.9,113.2 41.9,106.2
  region: 40.125,106.2 40.125,113.2 40.05,113.2 40.05,106.2
  rectangle: 71.2,106.8 75.7,110.1
  region: 43.175,110.1 43.175,106.675 48.4,106.675 48.4,110.1
  rectangle: 33.966,3.3 34.325,5.3
  rectangle: 52.062,3.3 52.425,5.3
  region: 46.758,6.444 46.578,6.624 44.602,4.648 44.782,4.469
  rectangle: 44.602,4.648 44.856,5.537
  region: 45.019,4.232 45.198,4.052 47.174,6.028 46.994,6.208
  region: 46.087,4.052 46.087,4.306 45.198,4.306 45.198,4.052
  region: 78.733,105.057 78.479,105.057 78.479,102.263 78.733,102.263
  region: 77.85,104.428 78.03,104.248 78.658,104.877 78.479,105.057
  rectangle: 79.067,102.263 79.321,105.057
  region: 79.321,105.057 79.142,104.877 79.77,104.248 79.95,104.428
  region: 3.133,105.057 2.879,105.057 2.879,102.263 3.133,102.263
  region: 2.25,104.428 2.43,104.248 3.058,104.877 2.879,105.057
  rectangle: 3.467,102.263 3.721,105.057
  region: 3.721,105.057 3.542,104.877 4.17,104.248 4.35,104.428
  region: 70.8,17.659 70.8,36.175 68.45,36.175 68.45,17.659
  rectangle: 69.5,41.167 70.322,46.247
  rectangle: 25.369,14.776 41.346,15.691
  rectangle: 25.369,8.089 41.346,9.004
  rectangle: 68.981,8.089 70.835,15.684
  region: 27.274,15.691 25.369,15.691 25.369,8.089 27.274,8.089
  lines w0.076: 28.4,4.9 28.781,5.154 28.527,5.154 29.035,5.535 ; 28.781,5.281 29.035,5.535 ; 28.781,5.408 29.035,5.535 ; 54.293,4.75 54.674,5.004 54.42,5.004 54.928,5.385 ; 54.674,5.131 54.928,5.385 ; 54.674,5.258 54.928,5.385
  lines w0.127: 27.385,4.363 28.018,4.363 ; 28.018,4.403 28.618,4.403 ; 28.058,4.143 28.618,4.37 ; 28.058,4.597 28.618,4.37 ; 28.068,4.283 28.618,4.393 ; 28.068,4.457 28.618,4.347 ; 28.618,3.97 28.618,4.77 ; 28.618,4.363 29.211,4.363 ; 53.278,4.213 53.911,4.213 ; 53.911,4.253 54.511,4.253 ; 53.951,3.993 54.511,4.22 ; 53.951,4.447 54.511,4.22 ; 53.961,4.133 54.511,4.243 ; 53.961,4.307 54.511,4.197 ; 54.511,3.82 54.511,4.62 ; 54.511,4.213 55.104,4.213 ; 57.406,27.797 57.92,28.505 ; 58.132,25.095 58.646,25.802 ; 28.618,4.37 28.018,4.77 28.018,3.97 28.618,4.37 ; 54.511,4.22 53.911,3.82 53.911,4.62 54.511,4.22
  lines w0.2: 82.1,106.3 82.1,106.7 ; 75.7,113.1 82.1,113.1 ; 75.7,113.1 75.7,106.7 82.1,106.7 ; 75.7,113.1 82.1,113.1 ; 82.1,106.7 82.1,113.1
  text "Xilinx®  Virtex 4™" at 47.3,110.4 h3.2
  text "XC4VSX35-FFG668C" at 48.443,107.648 h2.6
  text "SRAM-256Kx16" at 59.787,94.046 h1.27
  text "DRAM-16Mx16" at 37.656,93.538 h1.27
  text "FLASH" at 63.274,70.287 h0.86
  text "1831" at 69.123,42.461 h1.02 r90
  text "SRAM-256Kx16" at 65.738,20.546 h1.27 r90
  text "DB46.03" at 26.106,12.407 h2.5
  text "XC4VSX35-FFG668C" at 26.106,10.934 h1.52
  text "Xilinx Daughter Board" at 26.119,9.004 h1.52
  text "DB46.03" at 41.295,8.089 h1.52
  text "PROGRAM" at 29.083,1.524 h1.4
  text "POWER" at 48.133,1.524 h1.4
Bottom Overlay:
  drawing of 1206 lines, arcs and shapes, not listed
  text "Xilinx®  Virtex 4™" at 72.4,110.4 h3.2
  text "XC4VSX35-FFG668C" at 71.1,107.648 h2.6
  text "SRAM-256Kx16" at 74.671,94.041 h1.27
  text "DRAM-16Mx16" at 50.744,93.538 h1.27
  text "AD BUILD No:" at 27.325,93.086 h0.86
  text ".Application_BuildNumber" at 18.489,92.985 h1.52
  text "REVISION No:" at 26.913,91.579 h0.86
  text "SVN 9252" at 18.489,91.478 h1.52
  text "PCB MANUFACTURER:" at 32.25,90.02 h0.86
  text "MANUFACTURE" at 12.533,88.294 h1.02
  text "DATE" at 12.561,86.597 h1.02
  text "COMPLIANCE:" at 30.032,78.269 h1.14
  text "CLASS 2" at 10.982,75.983 h1.02
  text "IPC-A-600G" at 27.746,75.983 h1.02
  text "MAX" at 37.77,74.588 h0.56 r270
  text "8860" at 36.901,74.371 h0.64 r270
  text "CLASS 2" at 10.982,73.951 h1.02
  text "TYPE 3" at 17.332,73.951 h1.02
  text "IPC-6012D" at 27.746,73.951 h1.02
  text "DS2406" at 68.864,70.48 h0.71 r270
  text "1" at 2.97,57.72 h1
  text "1" at 27.57,57.32 h1
  text "SRAM-256Kx16" at 69.471,19.911 h1.27 r270
  text "1" at 27.27,6.72 h1
  text "DB46" at 10.469,3.141 h3.05
Bottom Solder:
  region: 62.377,48.776 62.377,51.824 58.567,51.824 58.567,48.776
PCB Boundary:
  lines w0.1: 38.7,113.2 82.2,113.2 ; 38.7,113.2 82.2,113.2 ; 38.7,113.2 0,113.2 0,0 41.1,0 82.2,0 82.2,113.2 ; 38.7,113.2 82.2,113.2 ; 38.7,113.2 82.2,113.2
Mechanical 7:
  lines w0.2: 60.885,45.166 56.4,48.4 56.4,53.4 60.885,56.634 ; 64.7,50.9 66.7,50.9 ; 65.7,49.9 65.7,51.9 ; 70.615,45.166 75.1,48.4 75.1,53.4 70.615,56.634
Keep Away From Edge:
  lines w0.2: 5.08,5.08 76.962,5.08 76.962,107.95 5.08,107.95 5.08,5.08

## Dimensions
7.8,11.1 to 21.8,12 on Dimensions
74.4,12 to 74.4,62.8 on Dimensions
78.9,109.9 to 82.2,0 on Dimensions
3.3,110.3 to 0,0.4 on Dimensions
7.8,-0.4 to 0,108.6 on Dimensions
82.2,0 to 0,103.1 on Dimensions
0,113.2 to -0.5,0 on Dimensions
74.4,12 to 82.2,-0.1 on Dimensions
41.1,3.9 to 82.2,0.5 on Dimensions
7.8,11.1 to -0.5,0 on Dimensions
41.1,3.3 to 82.4,0 on Dimensions
74.4,12 to 82.4,0 on Dimensions
72.794,113.2 to 78.9,109.9 on Dimensions

## Text inside footprints (layer, text, board x,y; h text height)
PBFREE: Bottom Overlay "Pb" at 80.159,71.749 h3.05
PBFREE1: Bottom Overlay "Pb" at 16.859,100.049 h3.05
PCB1: Top Overlay "D-810-0034" at 1.387,-2.002 h0.89